# Altium PCB NB3000XN.PcbDoc (part 66 of 71)
Units mil, origin at the board's own origin, x right, y up, seen from the top; angles counter-clockwise.
Board outline 9527.56 x 6929.77 mil, 6 copper layers (Top Layer, GND+SHIELD, MidLayer1, MidLayer2, P2 - 3V3+5V0, Bottom Layer), stack 62.375 mil thick; 832 components, 1027 nets, 4655 pads, 4981 vias.
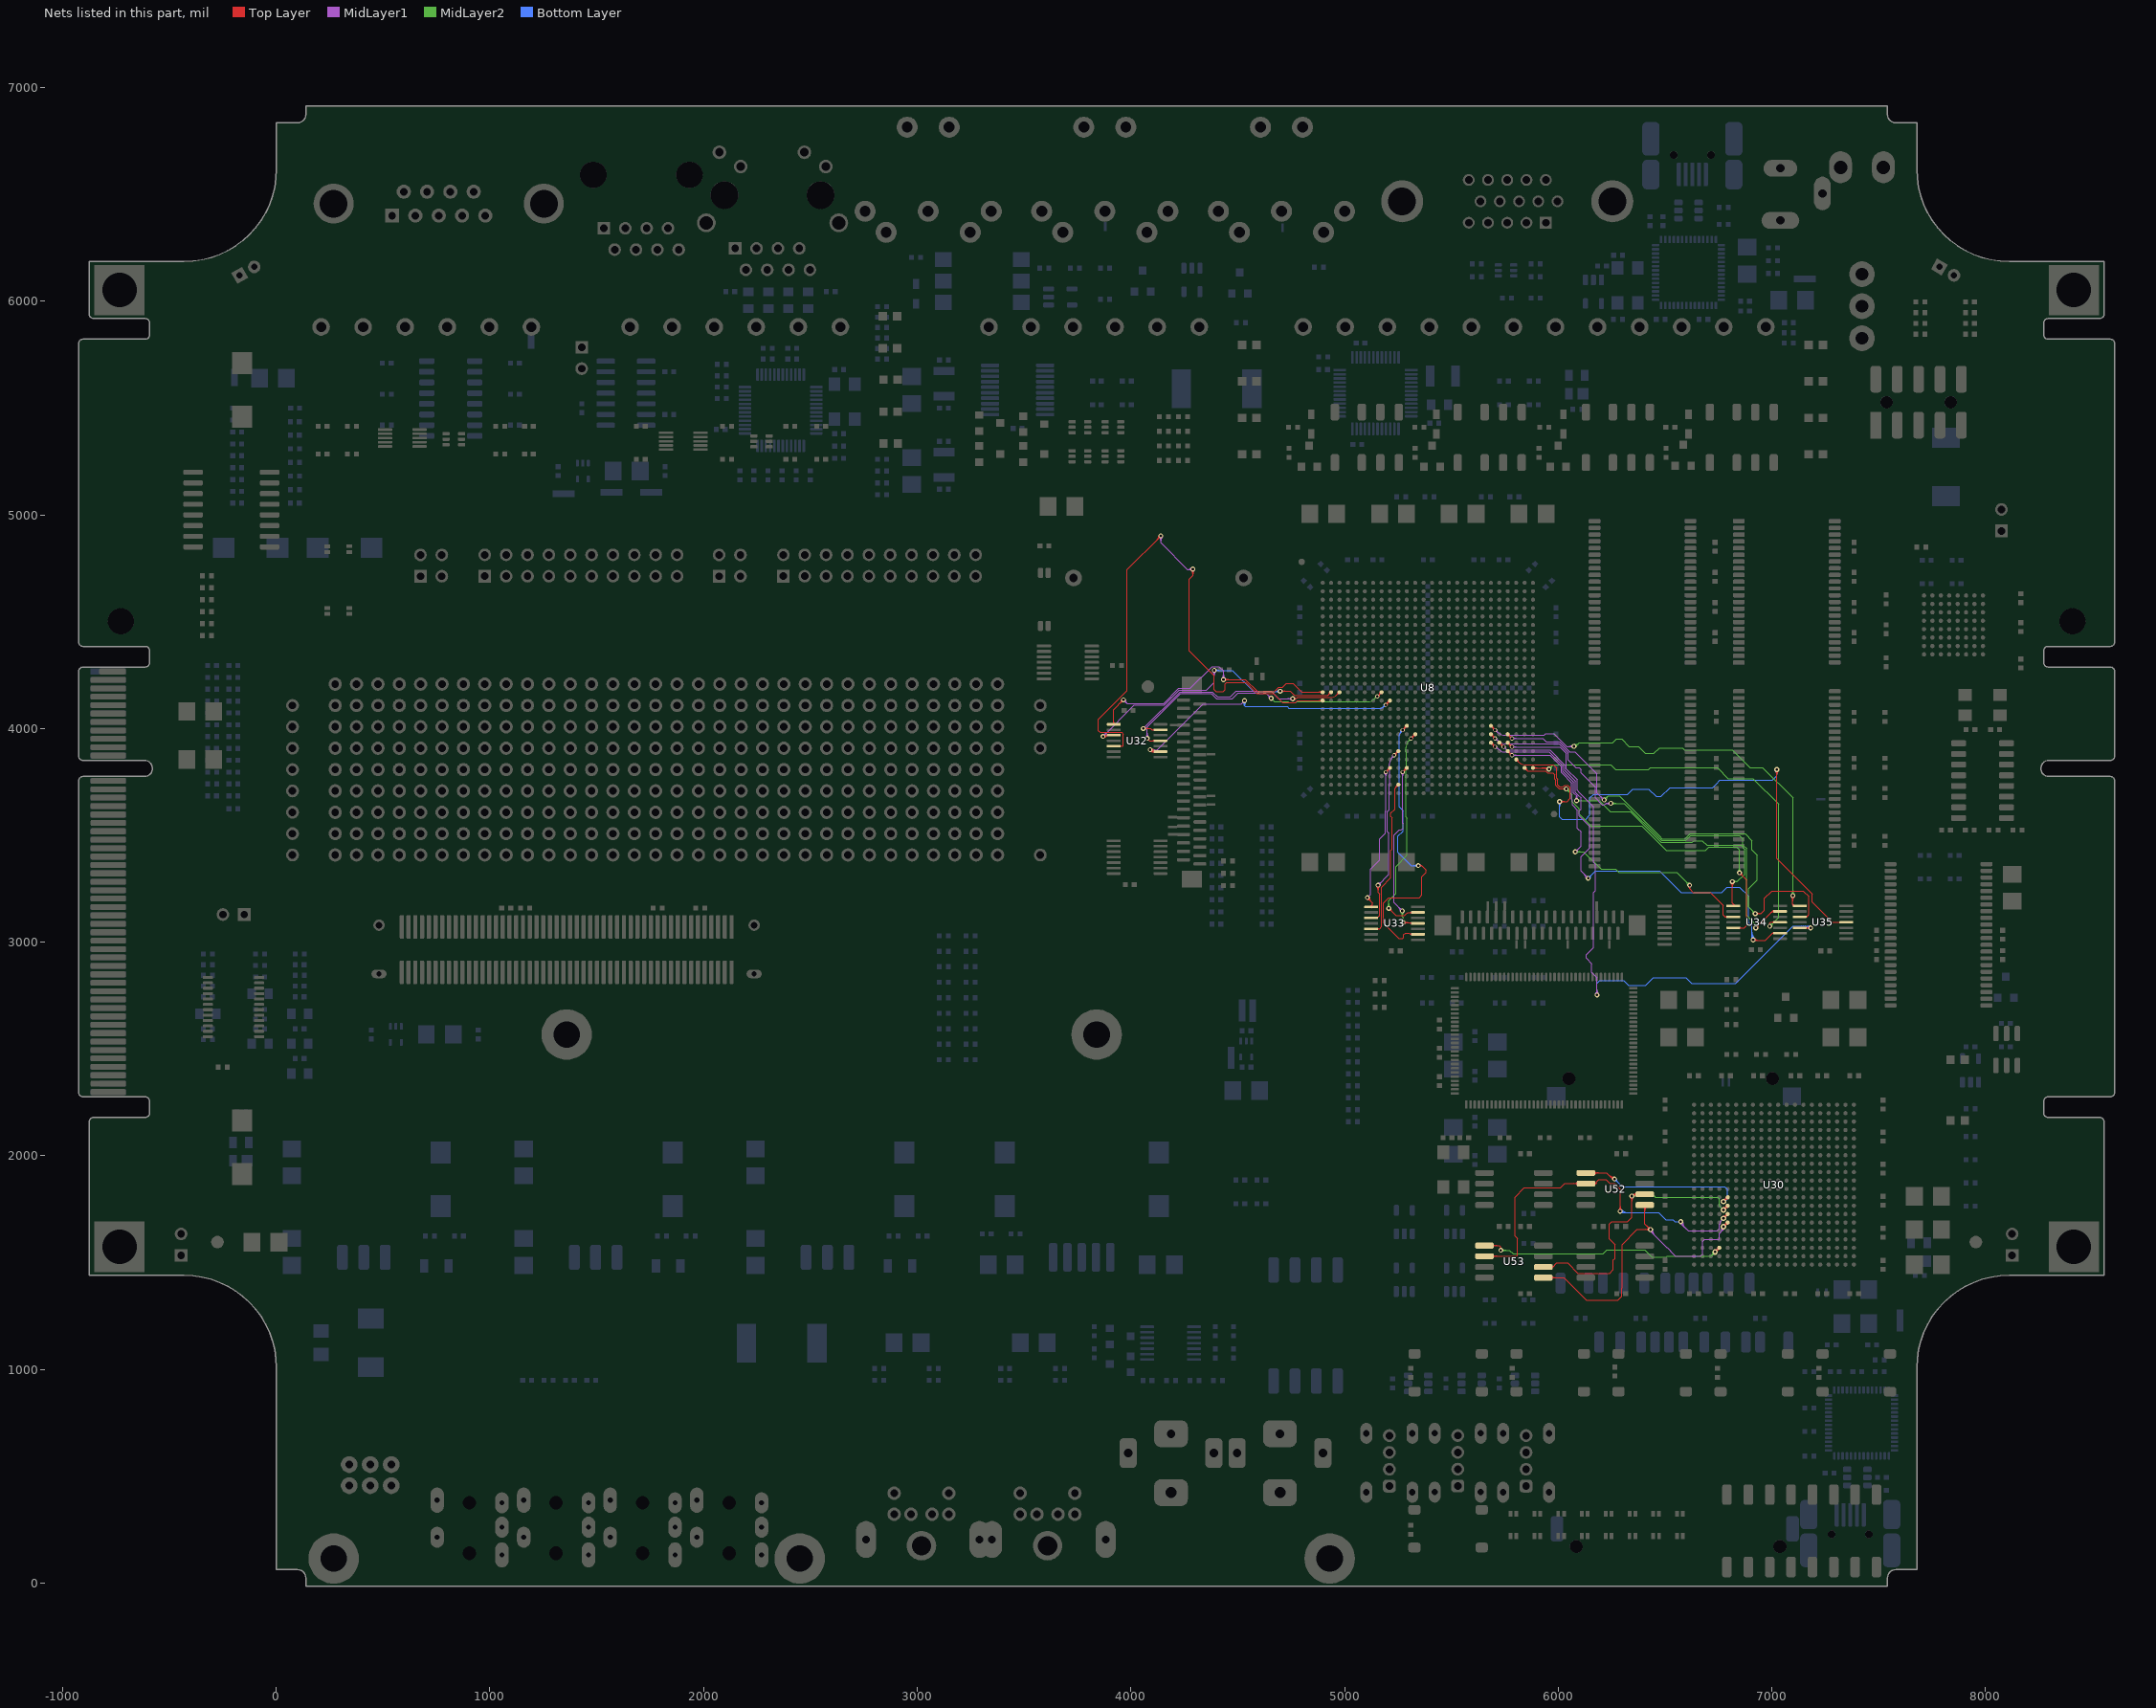
[diagram p70: the nets of this part, all layers, seen from the top]

## Via types
v1: diameter 23, hole 11.81, Top Layer to Bottom Layer, 3672 vias
v2: diameter 26, hole 11.81, Top Layer to Bottom Layer, 461 vias
v3: diameter 19, hole 11.81, Top Layer to Bottom Layer, tented both sides, 396 vias
v4: diameter 23.62, hole 11.81, Top Layer to Bottom Layer, 288 vias
v5: diameter 20, hole 11.81, Top Layer to Bottom Layer, 91 vias
v6: diameter 23, hole 11.81, Top Layer to Bottom Layer, tented both sides, 50 vias
v7: diameter 31, hole 11.81, Top Layer to Bottom Layer, 15 vias
v8: diameter 27.56, hole 11.81, Top Layer to Bottom Layer, tented both sides, 4 vias
v9: diameter 29, hole 11.81, Top Layer to Bottom Layer, 3 vias
v10: diameter 21, hole 11.81, Top Layer to Bottom Layer, 1 vias

## Nets (pads, with @x,y where several pads share a name; then routed paths per layer and width w, separated by ;. In a path a pad name is that pad's centre, name@x,y a point inside that pad or via, vN(x,y) a via of type N, cw(c..) or ccw(c..) an arc to the next point about the centre after c; other vN are vias at no path point) (continued)
USER_FLASH.DIN: U30.T15 U52.5 U53.5 | length 1959.8
  Top Layer w4: U53.5@5930.59,1430 6026.9,1430 6131.86,1325.04 6280.52,1325.04 6297.19,1341.71 6297.19,1380 6300,1382.81 6300,1585 6370.04,1655.04 v1(6431.86,1655.04) 6405.59,1681.31 U52.5@6405.59,1770 ; U53.5@5965.62,1424.5 cw(c5978.9,1411.22) 5978.9,1430 cw(c5978.9,1448.78) U53.5@5965.62,1435.5 ; U53.5@5968.45,1421.67 cw(c5988.56,1401.56) 5988.56,1430 cw(c5988.56,1458.44) U53.5@5968.45,1438.33 ; U52.5@6397.26,1761.67 cw(c6377.15,1741.56) 6405.59,1741.56 cw(c6434.03,1741.56) U52.5@6413.92,1761.67 ; U52.5@6400.09,1764.5 cw(c6386.81,1751.22) 6405.59,1751.22 cw(c6424.37,1751.22) U52.5@6411.09,1764.5 ; v1@6422.36,1655.04 ccw(c6399.42,1655.04) 6415.64,1671.26 ccw(c6431.86,1687.48) v1@6431.86,1664.54 ; v1@6425.14,1648.32 ccw(c6408.92,1632.11) 6408.92,1655.04 ccw(c6408.92,1677.98) v1@6425.14,1661.76 ; v1@6426.36,1655.04 ccw(c6413.08,1655.04) 6422.47,1664.43 ccw(c6431.86,1673.82) v1@6431.86,1660.54 ; v1@6427.97,1651.15 ccw(c6418.58,1641.76) 6418.58,1655.04 ccw(c6418.58,1668.32) v1@6427.97,1658.93
  Top Layer w8: v2(6773.78,1668.15) U30.T15@6793.46,1687.83 ; v2@6773.78,1677.15 ccw(c6773.78,1698.88) 6789.14,1683.51 ccw(c6804.51,1668.15) v2@6782.78,1668.15 ; U30.T15@6787.62,1687.83 cw(c6773.52,1687.83) 6783.49,1677.86 cw(c6793.46,1667.89) U30.T15@6793.46,1681.99
  MidLayer1 w4: v1(6431.86,1655.04) 6431.86,1646.71 6507.75,1570.81 6510.69,1570.81 6525.81,1555.69 6525.81,1552.75 6548.19,1530.37 6665.19,1530.37 6675.19,1540.37 6675.19,1600.04 6684.19,1609.04 6751.86,1609.04 6754.52,1611.71 6754.52,1636.71 6773.52,1655.71 v2@6773.52,1666.45 ; v1@6433.36,1655.04 ccw(c6457.1,1655.04) 6440.31,1638.25 ; v1@6437.36,1655.04 ccw(c6470.75,1655.04) 6447.14,1631.43 ; v1@6441.36,1655.04 ccw(c6484.41,1655.04) 6453.97,1624.6 ; 6760.62,1642.8 ccw(c6748.1,1655.32) v2@6763.94,1663.23 ; 6764.54,1646.73 ccw(c6753.33,1657.94) v2@6767.52,1665.02 ; 6768.47,1650.65 ccw(c6758.57,1660.55) v2@6771.1,1666.81 ; 6772.4,1654.58 ccw(c6763.81,1663.17) v2@6774.67,1668.6
USER_FLASH.DOUT: U30.T14 U52.2 U53.2 | length 2145.6
  Top Layer w4: U53.2@5655,1530 5805,1530 5810,1535 5810,1613.56 5798.52,1625.04 5798.52,1806.71 5841.86,1850.04 6011.23,1850.04 6031.19,1870 6177.97,1870 ; U53.2@5690.03,1524.5 cw(c5703.31,1511.22) 5703.31,1530 cw(c5703.31,1548.78) U53.2@5690.03,1535.5 ; U53.2@5692.86,1521.67 cw(c5712.97,1501.56) 5712.97,1530 cw(c5712.97,1558.44) U53.2@5692.86,1538.33 ; U52.2@6092.14,1861.67 ccw(c6072.03,1841.56) 6072.03,1870 ccw(c6072.03,1898.44) U52.2@6092.14,1878.33 ; U52.2@6094.97,1864.5 ccw(c6081.69,1851.22) 6081.69,1870 ccw(c6081.69,1888.78) U52.2@6094.97,1875.5 ; U52.2@6170.21,1865.05 cw(c6177.97,1861.45) 6177.97,1870 ; U52.2@6170.21,1874.95 ccw(c6177.97,1878.55) 6177.97,1870 ; v1@6283.47,1747.43 ccw(c6267.26,1763.64) 6290.19,1763.64 ccw(c6313.13,1763.64) v1@6296.91,1747.43 ; v1@6286.3,1744.6 ccw(c6276.91,1753.99) 6290.19,1753.99 ccw(c6303.47,1753.99) v1@6294.08,1744.6 ; v1(6290.19,1740.71) 6290.19,1845.04 6265.19,1870.04 6241.19,1870.04 6223.35,1887.88 6189.97,1887.88 6179.64,1877.55 6179.64,1871.67 6177.97,1870
  Top Layer w8: v2(6773.78,1707.52) U30.T14@6793.46,1727.2 ; v2@6773.78,1716.52 ccw(c6773.78,1738.25) 6789.14,1722.88 ccw(c6804.51,1707.52) v2@6782.78,1707.52 ; U30.T14@6787.62,1727.2 cw(c6773.52,1727.2) 6783.49,1717.23 cw(c6793.46,1707.26) U30.T14@6793.46,1721.36
  MidLayer1 w4: v1(6573.52,1691.71) 6573.52,1683.37 6608.52,1648.37 6744.19,1648.37 6754.19,1658.37 6754.19,1678.15 6758.64,1682.6 6758.64,1692.37 v2(6773.78,1707.52) ; v1@6575.02,1691.71 ccw(c6598.76,1691.71) 6581.98,1674.92 ; v1@6579.02,1691.71 ccw(c6612.42,1691.71) 6588.81,1668.09 ; v1@6583.02,1691.71 ccw(c6626.08,1691.71) 6595.63,1661.26
  Bottom Layer w4: v1@6288.42,1738.94 ccw(c6301.86,1752.38) 6301.86,1733.37 ; v1(6290.19,1740.71) 6297.52,1733.37 6469.86,1733.37 6503.19,1700.04 6537.98,1700.04 6546.31,1691.71 v1(6573.52,1691.71) ; v1@6291.25,1741.77 ccw(c6311.51,1762.03) 6311.51,1733.37 ; v1@6294.08,1744.6 ccw(c6321.17,1771.69) 6321.17,1733.37 ; v1@6296.91,1747.43 ccw(c6330.83,1781.35) 6330.83,1733.37
USER_FLASH.FLASH1_CS_N: U30.U18 U53.1 | length 1417.5
  Top Layer w4: U53.1@5655,1580 5725,1580 5731.86,1573.14 v1(5731.86,1558.37) ; U53.1@5690.03,1574.5 cw(c5703.31,1561.22) 5703.31,1580 cw(c5703.31,1598.78) U53.1@5690.03,1585.5 ; U53.1@5692.86,1571.67 cw(c5712.97,1551.56) 5712.97,1580 cw(c5712.97,1608.44) U53.1@5692.86,1588.33
  Top Layer w8: v2(6734.41,1550.04) U30.U18@6754.09,1569.72 ; v2@6734.41,1559.04 ccw(c6734.41,1580.77) 6749.77,1565.4 ccw(c6765.14,1550.04) v2@6743.41,1550.04 ; U30.U18@6748.25,1569.72 cw(c6734.15,1569.72) 6744.12,1559.75 cw(c6754.09,1549.78) U30.U18@6754.09,1563.88
  MidLayer2 w4: v1(5731.86,1558.37) 5771.67,1558.37 5788.67,1541.37 6210.88,1541.37 6228.54,1559.04 6406.19,1559.04 6434.52,1530.71 6438.04,1527.19 6507.38,1527.19 6510.9,1530.71 6715.08,1530.71 v2(6734.41,1550.04) ; v1@5735.75,1554.49 cw(c5745.14,1545.1) 5745.14,1558.37 cw(c5745.14,1571.65) v1@5735.75,1562.26 ; v1@5738.57,1551.66 cw(c5754.79,1535.44) 5754.79,1558.37 cw(c5754.79,1581.31) v1@5738.57,1565.09 ; v2@6723.41,1550.04 cw(c6696.85,1550.04) 6715.63,1531.26 cw(c6734.41,1512.49) v2@6734.41,1539.04 ; v2@6727.41,1550.04 cw(c6710.51,1550.04) 6722.46,1538.09 cw(c6734.41,1526.14) v2@6734.41,1543.04
USER_FLASH.FLASH2_CS_N: U30.T12 U52.1 | length 1120.8
  Top Layer w4: U52.1@6130,1920 6226.9,1920 6255.19,1891.71 v1(6263.52,1891.71) ; U52.1@6165.03,1914.5 cw(c6178.31,1901.22) 6178.31,1920 cw(c6178.31,1938.78) U52.1@6165.03,1925.5 ; U52.1@6167.86,1911.67 cw(c6187.97,1891.56) 6187.97,1920 cw(c6187.97,1948.44) U52.1@6167.86,1928.33 ; 6233.08,1913.82 ccw(c6263.53,1944.26) v1@6263.52,1901.21 ; 6239.91,1906.99 ccw(c6263.52,1930.61) v1@6263.52,1897.21 ; 6246.74,1900.16 ccw(c6263.52,1916.95) v1@6263.52,1893.21
  Top Layer w8: v2(6773.78,1786.26) U30.T12@6793.46,1805.94 ; v2@6773.78,1795.26 ccw(c6773.78,1816.99) 6789.14,1801.62 ccw(c6804.51,1786.26) v2@6782.78,1786.26 ; U30.T12@6787.62,1805.94 cw(c6773.52,1805.94) 6783.49,1795.97 cw(c6793.46,1786) U30.T12@6793.46,1800.1
  Bottom Layer w4: v1@6263.52,1882.21 cw(c6263.52,1859.27) 6279.74,1875.49 cw(c6295.96,1891.71) v1@6273.02,1891.71 ; v1@6263.52,1886.21 cw(c6263.52,1872.93) 6272.91,1882.32 cw(c6282.3,1891.71) v1@6269.02,1891.71 ; v1(6263.52,1891.71) 6299.86,1855.37 6779.19,1855.37 6792.86,1841.71 6792.86,1805.34 v2(6773.78,1786.26) ; v2@6773.78,1793.26 ccw(c6773.78,1810.16) 6785.73,1798.21 ccw(c6797.68,1786.26) v2@6780.78,1786.26 ; v2@6773.78,1797.26 ccw(c6773.78,1823.82) 6792.56,1805.04 ccw(c6811.33,1786.26) v2@6784.78,1786.26
USER_FLASH.SCLK: U30.T13 U52.6 U53.6 | length 1722.7
  Top Layer w4: U53.6@5930.59,1480 5975.9,1480 ; U53.6@5971.41,1476.65 cw(c5975.9,1475.32) 5975.9,1480 ; U53.6@5971.41,1483.35 ccw(c5975.9,1484.68) 5975.9,1480 ; v1@6338.14,1805.32 cw(c6321.92,1789.11) 6344.86,1789.11 cw(c6367.79,1789.11) 6351.57,1805.32 cw(c6387.01,1769.89) U52.6@6387.01,1820 ; v1@6340.97,1808.15 cw(c6331.58,1798.76) 6344.86,1798.76 cw(c6358.14,1798.76) 6348.75,1808.15 cw(c6377.35,1779.55) U52.6@6377.35,1820 ; v1@6343.09,1813.81 cw(c6358.04,1798.86) 6358.04,1820 ; v1@6345.92,1810.98 cw(c6367.69,1789.2) U52.6@6367.69,1820 ; U52.6@6366.56,1813.03 ccw(c6352.82,1802.95) v1@6352.82,1820 ; U52.6@6366.56,1826.97 cw(c6352.82,1837.05) v1@6352.82,1820 ; U52.6@6369.79,1815.4 ccw(c6360.71,1808.74) 6360.71,1820 ccw(c6360.71,1831.26) U52.6@6369.79,1824.6 ; U52.6@6405.59,1820 v1@6352.82,1820 ; 5975.9,1480 5994.27,1498.37 6043.86,1498.37 6092.19,1450.04 6241.52,1450.04 6258.48,1467 6258.48,1511.96 6266.52,1520 6266.52,1585.04 6240.19,1611.37 6240.19,1681.37 6250.52,1691.71 6323.52,1691.71 6344.86,1713.04 v1(6344.86,1812.04) v1@6352.82,1820
  Top Layer w8: v2(6773.78,1746.89) U30.T13@6793.46,1766.57 ; v2@6773.78,1755.89 ccw(c6773.78,1777.62) 6789.14,1762.25 ccw(c6804.51,1746.89) v2@6782.78,1746.89 ; U30.T13@6787.62,1766.57 cw(c6773.52,1766.57) 6783.49,1756.6 cw(c6793.46,1746.63) U30.T13@6793.46,1760.73
  MidLayer2 w4: v1(6344.86,1812.04) 6449,1812.04 6455,1806.04 6748.52,1806.04 6754.52,1800.04 6754.52,1766.37 6773.78,1747.12 v2(6773.78,1746.89) ; v1@6348.75,1808.15 cw(c6358.14,1798.76) 6358.14,1812.04 cw(c6358.14,1825.32) v1@6348.75,1815.93 ; v1@6351.57,1805.32 cw(c6367.79,1789.11) 6367.79,1812.04 cw(c6367.79,1834.98) v1@6351.57,1818.76
USER_LEDS.LED0.BLUE: U8.P2 U32.3 | length 1840.9
  Top Layer w4: v1(3869.52,3963.37) 3874.97,3968.82 U32.3@3920,3968.82 ; v1@3870.58,3962.31 cw(c3886.29,3946.61) 3886.29,3968.82 ; v1@3873.41,3959.49 cw(c3895.95,3936.95) U32.3@3895.95,3968.82 ; v1@3876.24,3956.66 cw(c3905.6,3927.29) U32.3@3905.6,3968.82 ; U32.3@3890.69,3965.99 ccw(c3883.86,3959.16) 3883.86,3968.82 ccw(c3883.86,3978.48) U32.3@3890.69,3971.65 ; v1(4698.52,4175.04) 4730,4175.04 4736,4175.04 4745.79,4175.04 4754.79,4166.04 4766.33,4154.5 4854.95,4154.5 4855.26,4154.81 4860,4154.81 4870,4154.81 4917.53,4154.81 ccw(c4917.53,4164.96) 4924.71,4157.78 ; v1@4702.41,4171.15 cw(c4711.8,4161.76) 4711.8,4175.04 cw(c4711.8,4188.32) v1@4702.41,4178.93 ; v1@4705.24,4168.32 cw(c4721.46,4152.11) 4721.46,4175.04 cw(c4721.46,4197.98) v1@4705.24,4181.76 ; U8.P2@4929.9,4170.31 cw(c4912.17,4170.31) 4924.71,4157.78 ; U8.P2@4937.24,4162.97 ccw(c4937.24,4145.25) 4924.71,4157.78
  MidLayer1 w4: v1(3869.52,3963.37) 4015.86,4109.71 ; v1@3869.52,3968.87 ccw(c3869.52,3982.15) 3878.91,3972.76 ccw(c3888.3,3963.37) v1@3875.02,3963.37 ; v1@3869.52,3972.87 ccw(c3869.52,3995.81) 3885.74,3979.59 ccw(c3901.96,3963.37) v1@3879.02,3963.37 ; 4136.17,4109.71 4015.86,4109.71 ; v1@4383.47,4265.99 cw(c4367.26,4249.77) 4390.19,4249.77 cw(c4413.13,4249.77) v1@4396.91,4265.99 ; v1@4386.3,4268.82 cw(c4376.91,4259.43) 4390.19,4259.43 cw(c4403.47,4259.43) v1@4394.08,4268.82 ; v1(4390.19,4272.71) 4390.19,4215.19 4355,4180 4227.17,4180 4156.88,4109.71 4015.86,4109.71
  Bottom Layer w4: v1(4390.19,4272.71) 4475.86,4272.71 4576.06,4172.5 4695.98,4172.5 v1(4698.52,4175.04) ; v1@4394.08,4268.82 cw(c4403.47,4259.43) 4403.47,4272.71 cw(c4403.47,4285.99) v1@4394.08,4276.6 ; v1@4396.91,4265.99 cw(c4413.13,4249.77) 4413.13,4272.71 cw(c4413.13,4295.64) v1@4396.91,4279.43 ; 4669.46,4172.5 ccw(c4669.46,4204.11) v1@4691.81,4181.76 ; 4679.11,4172.5 ccw(c4679.11,4194.45) v1@4694.64,4178.93 ; 4681.72,4172.5 cw(c4681.72,4158.24) v1@4691.81,4168.32
USER_LEDS.LED0.GREEN: U8.R1 U32.5 | length 2987.1
  Top Layer w4: U32.5@3920,3917.64 3962.64,3917.64 3965.19,3920.19 3965.19,3973.71 3956.86,3982.04 3856.86,3982.04 3848.52,3990.37 3848.52,4043.71 3981.86,4177.04 3981.86,4743.71 v1(4140.19,4902.04) ; U32.5@3949.31,3914.81 cw(c3956.14,3907.98) 3956.14,3917.64 cw(c3956.14,3927.3) U32.5@3949.31,3920.47 ; v1@4130.69,4902.04 cw(c4107.76,4902.04) 4123.97,4885.82 cw(c4140.19,4869.61) v1@4140.19,4892.54 ; v1@4134.69,4902.04 cw(c4121.41,4902.04) 4130.8,4892.65 cw(c4140.19,4883.26) v1@4140.19,4896.54 ; v1@4283.47,4739.99 cw(c4267.26,4723.77) 4290.19,4723.77 cw(c4313.13,4723.77) v1@4296.91,4739.99 ; v1@4286.3,4742.82 cw(c4276.91,4733.43) 4290.19,4733.43 cw(c4303.47,4733.43) v1@4294.08,4742.82 ; v1(4290.19,4746.71) 4290.19,4716.71 4273.19,4699.71 4273.19,4363.71 4291.13,4345.77 4390.19,4246.71 4390.19,4182.37 4398.52,4174.04 4431.86,4174.04 4440.19,4182.37 4440.19,4208.37 4448.52,4216.71 4537.21,4216.71 4589.42,4164.5 4667.4,4164.5 4682.44,4149.46 4710.86,4121.04 4769.52,4121.04 4779.43,4130.94 4860,4130.94 4870,4130.94 U8.R1@4897.87,4130.94 ; U8.R1@4892.57,4125.64 ccw(c4879.77,4112.84) 4879.77,4130.94 ccw(c4879.77,4149.05) U8.R1@4892.57,4136.25 ; U8.R1@4892.68,4125.75 ccw(c4880.15,4113.22) 4880.15,4130.94 ccw(c4880.15,4148.67) U8.R1@4892.68,4136.14
  MidLayer1 w4: v1@4133.47,4895.32 cw(c4117.26,4879.11) 4140.19,4879.11 cw(c4163.13,4879.11) v1@4146.91,4895.32 ; v1@4136.3,4898.15 cw(c4126.91,4888.76) 4140.19,4888.76 cw(c4153.47,4888.76) v1@4144.08,4898.15 ; v1(4140.19,4902.04) 4140.19,4869.69 4264.88,4745 ; 4271.38,4745 cw(c4271.38,4727.9) v1@4283.47,4739.99 ; 4273.91,4745 ccw(c4273.91,4761.48) v1@4286.12,4750.4 ; v1@4283.16,4753.09 cw(c4264.88,4769.68) 4264.88,4745 ; v1@4290,4745 4264.88,4745
USER_LEDS.LED0.RED: U8.P1 U32.1 | length 1547.5
  Top Layer w4: U32.1@3917.17,4022.83 ccw(c3910.34,4029.66) 3920,4029.66 ccw(c3929.66,4029.66) U32.1@3922.83,4022.83 ; U32.1@3920,4020 3920,4089.18 v1(3965.19,4134.37) ; v1@3955.69,4134.37 cw(c3932.76,4134.37) 3948.97,4118.16 cw(c3965.19,4101.94) v1@3965.19,4124.87 ; v1@3959.69,4134.37 cw(c3946.41,4134.37) 3955.8,4124.99 cw(c3965.19,4115.6) v1@3965.19,4128.87 ; v1(4433.52,4229.37) 4535.86,4229.37 4590.19,4175.04 4592.73,4172.5 4670.98,4172.5 4683.33,4184.84 4691.19,4192.71 4710.84,4192.71 4728.84,4210.71 4758.29,4210.71 4798.69,4170.31 4807.92,4170.31 4855.26,4170.31 4860,4170.31 4870,4170.31 U8.P1@4897.87,4170.31 ; v1@4437.41,4225.49 cw(c4446.8,4216.1) 4446.8,4229.37 cw(c4446.8,4242.65) v1@4437.41,4233.26 ; v1@4440.24,4222.66 cw(c4456.46,4206.44) 4456.46,4229.37 cw(c4456.46,4252.31) v1@4440.24,4236.09 ; U8.P1@4892.57,4165.01 ccw(c4879.77,4152.21) 4879.77,4170.31 ccw(c4879.77,4188.42) U8.P1@4892.57,4175.62 ; U8.P1@4892.68,4165.12 ccw(c4880.15,4152.59) 4880.15,4170.31 ccw(c4880.15,4188.04) U8.P1@4892.68,4175.51
  MidLayer1 w4: v1@3965.19,4124.87 cw(c3965.19,4101.94) 3981.41,4118.16 cw(c3997.63,4134.37) v1@3974.69,4134.37 ; v1@3965.19,4128.87 cw(c3965.19,4115.6) 3974.58,4124.99 cw(c3983.97,4134.37) v1@3970.69,4134.37 ; v1(3965.19,4134.37) 3981.86,4117.71 4153.56,4117.71 4223.86,4188 4278,4188 4380.21,4290.21 4412.05,4290.21 4433.52,4268.74 v1(4433.52,4229.37) ; v1@4426.81,4236.09 ccw(c4410.59,4252.31) 4433.52,4252.31 ccw(c4456.46,4252.31) v1@4440.24,4236.09 ; v1@4429.64,4233.26 ccw(c4420.25,4242.65) 4433.52,4242.65 ccw(c4446.8,4242.65) v1@4437.41,4233.26
USER_LEDS.LED1.BLUE: U8.P8 U32.11 | length 1593.3
  Top Layer w4: v1(4076.86,3954.37) 4088,3943.23 U32.11@4138.5,3943.23 ; U32.11@4109.2,3940.4 ccw(c4102.37,3933.57) 4102.37,3943.23 ccw(c4102.37,3952.89) U32.11@4109.2,3946.06 ; v3(5153.78,4150.63) U8.P8@5173.46,4170.31 ; U8.P8@5165.96,4170.31 cw(c5147.86,4170.31) 5160.66,4157.51 cw(c5173.46,4144.71) U8.P8@5173.46,4162.81 ; U8.P8@5166.12,4170.31 cw(c5148.4,4170.31) 5160.93,4157.78 cw(c5173.46,4145.25) U8.P8@5173.46,4162.97 ; 5166.58,4163.43 cw(c5153.78,4176.24) 5153.78,4158.13 ccw(c5153.78,4176.24) 5166.58,4163.43 ; 5166.58,4163.43 ccw(c5179.39,4150.63) 5161.28,4150.63 cw(c5179.39,4150.63) 5166.58,4163.43
  MidLayer1 w4: v1@4070.14,3961.09 ccw(c4053.92,3977.31) 4076.86,3977.31 ccw(c4099.79,3977.31) v1@4083.57,3961.09 ; v1@4072.97,3958.26 ccw(c4063.58,3967.65) 4076.86,3967.65 ccw(c4090.14,3967.65) v1@4080.75,3958.26 ; v1(4076.86,3954.37) 4076.86,4007.06 4233.8,4164 4376.23,4164 4400.52,4139.71 4474.19,4139.71 4501.19,4166.71 4597.23,4166.71 4599.44,4164.5 4620.56,4164.5 4622.77,4166.71 4631.86,4166.71 v1(4656.86,4141.71) ; v1@4647.36,4141.71 ccw(c4624.42,4141.71) 4640.64,4157.93 ccw(c4656.86,4174.14) v1@4656.86,4151.21 ; v1@4651.36,4141.71 ccw(c4638.08,4141.71) 4647.47,4151.1 ccw(c4656.86,4160.49) v1@4656.86,4147.21
  MidLayer2 w4: v1(4656.86,4141.71) 4671.8,4126.77 4735.52,4126.77 4741.52,4120.77 4771.52,4120.77 4777.52,4126.77 4855.26,4126.77 4860,4126.77 4870,4126.77 4997.36,4126.77 5016.78,4126.77 5090.9,4126.77 5110.4,4126.77 ccw(c5110.4,4168.5) 5139.91,4138.99 ; v3@5146.31,4151.28 cw(c5128.27,4152.86) 5139.91,4138.99 ; v3@5153.13,4143.16 ccw(c5151.55,4125.12) 5139.91,4138.99
USER_LEDS.LED1.GREEN: U8.P3 U32.13 | length 1313.1
  Top Layer w4: v1(4058.52,4000.04) 4092.89,4000.04 4098.52,3994.41 U32.13@4138.5,3994.41 ; v1@4062.41,3996.15 cw(c4071.8,3986.76) 4071.8,4000.04 cw(c4071.8,4013.32) v1@4062.41,4003.93 ; v1@4065.24,3993.32 cw(c4081.46,3977.11) 4081.46,4000.04 cw(c4081.46,4022.98) v1@4065.24,4006.76 ; U32.13@4109.2,3991.58 ccw(c4102.37,3984.75) 4102.37,3994.41 ccw(c4102.37,4004.07) U32.13@4109.2,3997.24 ; v1(4757.52,4139.37) 4773.52,4139.37 ; v1@4765.87,4134.83 cw(c4773.52,4130.65) 4773.52,4139.37 ; v1@4765.87,4143.92 ccw(c4773.52,4148.1) 4773.52,4139.37 ; U8.P3@4969.27,4170.31 cw(c4951.55,4170.31) 4964.08,4157.78 ; U8.P3@4976.61,4162.97 ccw(c4976.61,4145.25) 4964.08,4157.78 ; 4773.52,4139.37 4780.6,4146.45 4855.26,4146.45 4860,4146.45 4870,4146.45 4936.73,4146.45 ccw(c4936.73,4185.13) 4964.08,4157.78
  MidLayer1 w4: v1(4058.52,4000.04) 4230.48,4172 4381.23,4172 ; v1@4750.81,4132.66 ccw(c4734.59,4116.44) 4734.59,4139.37 ccw(c4734.59,4162.31) v1@4750.81,4146.09 ; v1@4753.64,4135.49 ccw(c4744.25,4126.1) 4744.25,4139.37 ccw(c4744.25,4152.65) v1@4753.64,4143.26 ; v1(4757.52,4139.37) 4692.86,4139.37 4657.19,4175.04 4619.79,4175.04 4617.25,4172.5 4602.75,4172.5 4600.21,4175.04 4493.19,4175.04 4465.86,4147.71 4405.52,4147.71 ; 4381.23,4172 4405.52,4147.71 ; 4381.23,4172 4405.52,4147.71
USER_LEDS.LED1.RED: U8.R9 U32.9 | length 1687.8
  Top Layer w4: v1@4088.42,3899.27 ccw(c4105.87,3916.72) 4105.87,3892.05 ; v1(4090.19,3901.04) 4090.19,3900.04 4098.18,3892.05 U32.9@4138.5,3892.05 ; v1@4091.25,3902.1 ccw(c4115.52,3926.37) U32.9@4115.52,3892.05 ; v1@4094.08,3904.93 ccw(c4125.18,3936.03) U32.9@4125.18,3892.05 ; v1@4096.91,3907.76 ccw(c4134.84,3945.69) U32.9@4134.84,3892.05 ; U32.9@4109.2,3889.22 ccw(c4102.37,3882.39) 4102.37,3892.05 ccw(c4102.37,3901.71) U32.9@4109.2,3894.88 ; v3(5193.15,4111.26) U8.R9@5212.83,4130.94 ; U8.R9@5205.33,4130.94 cw(c5187.23,4130.94) 5200.03,4118.14 cw(c5212.83,4105.34) U8.R9@5212.83,4123.44 ; U8.R9@5205.49,4130.94 cw(c5187.77,4130.94) 5200.3,4118.41 cw(c5212.83,4105.88) U8.R9@5212.83,4123.6 ; 5205.95,4124.06 cw(c5193.15,4136.87) 5193.15,4118.76 ccw(c5193.15,4136.87) 5205.95,4124.06 ; 5205.95,4124.06 ccw(c5218.76,4111.26) 5200.65,4111.26 cw(c5218.76,4111.26) 5205.95,4124.06
  MidLayer1 w4: v1(4090.19,3901.04) 4122.48,3901.04 4337.15,4115.71 4516.86,4115.71 v1(4531.86,4130.71) ; v1@4094.08,3897.15 cw(c4103.47,3887.76) 4103.47,3901.04 cw(c4103.47,3914.32) v1@4094.08,3904.93 ; v1@4096.91,3894.32 cw(c4113.13,3878.11) 4113.13,3901.04 cw(c4113.13,3923.98) v1@4096.91,3907.76
  Bottom Layer w4: v1@4525.14,4123.99 cw(c4508.92,4107.77) 4531.86,4107.77 cw(c4554.79,4107.77) v1@4538.57,4123.99 ; v1@4527.97,4126.82 cw(c4518.58,4117.43) 4531.86,4117.43 cw(c4545.14,4117.43) v1@4535.75,4126.82 ; v1(4531.86,4130.71) 4531.86,4107.37 4535.32,4103.92 4731.99,4103.92 4740.15,4095.75 4855.26,4095.75 4860,4095.75 4870,4095.75 5076.1,4095.75 5169.64,4095.75 ccw(c5169.64,4109.8) 5179.57,4099.87 ; v3@5185.68,4111.91 cw(c5167.64,4113.49) 5179.28,4099.62 cw(c5190.92,4085.75) v3@5192.5,4103.79
USER_LEDS.LED2.BLUE: U8.AA10 U33.3 | length 1124
  Top Layer w4: U33.3@5125,3113.82 5153.82,3113.82 5165.19,3125.19 5165.19,3225 5156.86,3233.33 v1(5156.86,3266.71) ; v1@5150.14,3259.99 cw(c5133.92,3243.77) 5156.86,3243.77 cw(c5179.79,3243.77) v1@5163.57,3259.99 ; U33.3@5151.48,3117.82 ccw(c5151.48,3133.12) 5162.3,3122.3 ; v1@5152.97,3262.82 cw(c5143.58,3253.43) 5156.86,3253.43 cw(c5170.14,3253.43) v1@5160.75,3262.82 ; v3(5232.52,3875.04) U8.AA10@5252.2,3894.72 ; U8.AA10@5244.7,3894.72 cw(c5226.6,3894.72) 5239.4,3881.92 cw(c5252.2,3869.12) U8.AA10@5252.2,3887.22 ; U8.AA10@5244.86,3894.72 cw(c5227.14,3894.72) 5239.67,3882.19 cw(c5252.2,3869.66) U8.AA10@5252.2,3887.38 ; 5245.32,3887.84 ccw(c5258.13,3875.04) 5240.02,3875.04 cw(c5258.13,3875.04) 5245.32,3887.84 ; 5245.32,3887.84 cw(c5232.52,3900.65) 5232.52,3882.54 ccw(c5232.52,3900.65) 5245.32,3887.84
  MidLayer1 w4: v1(5156.86,3266.71) 5207.86,3317.71 5207.86,3510.73 5200.86,3517.73 5200.86,3611.63 5208.66,3619.43 5208.66,3660 5208.66,3670 5208.66,3718.62 5208.66,3738.04 5208.66,3812.16 ; v1@5156.86,3272.21 ccw(c5156.86,3285.49) 5166.25,3276.1 ccw(c5175.64,3266.71) v1@5162.36,3266.71 ; v1@5156.86,3276.21 ccw(c5156.86,3299.14) 5173.07,3282.93 ccw(c5189.29,3266.71) v1@5166.36,3266.71 ; 5208.66,3798.23 5208.66,3812.16 ; v3@5225.05,3874.39 cw(c5207.01,3872.81) 5220.88,3861.17 ; v3@5233.17,3867.57 ccw(c5234.75,3849.53) 5220.88,3861.17 ; 5208.66,3812.16 5208.66,3831.66 cw(c5250.39,3831.66) 5220.88,3861.17
USER_LEDS.LED2.GREEN: U8.AE10 U33.5 | length 814.7
  Top Layer w4: U33.5@5125,3062.64 5163.52,3062.64 5173.52,3072.64 5173.52,3258.37 5216.19,3301.04 5216.19,3428.82 5222.02,3434.65 5222.02,3495.87 5222.02,3511 5222.02,3583.79 5217.02,3588.79 5217.02,3603.29 5236.7,3622.96 5236.7,3660 5236.7,3670 5236.7,3717.53 ; U33.5@5154.31,3059.81 cw(c5161.14,3052.98) 5161.14,3062.64 cw(c5161.14,3072.3) U33.5@5154.31,3065.47 ; 5236.7,3717.53 cw(c5246.85,3717.53) 5239.67,3724.71 ; 5236.7,3717.53 cw(c5246.85,3717.53) 5239.67,3724.71 ; 5239.67,3724.71 ccw(c5227.14,3737.24) 5244.86,3737.24 cw(c5227.14,3737.24) 5239.67,3724.71 ; 5239.67,3724.71 cw(c5252.2,3712.17) 5252.2,3729.9 ccw(c5252.2,3712.17) 5239.67,3724.71
USER_LEDS.LED2.RED: U8.AC9 U33.1 | length 980.9
  Top Layer w4: v1@5106.86,3198.87 cw(c5106.86,3175.94) 5123.07,3192.16 cw(c5139.29,3208.37) v1@5116.36,3208.37 ; v1@5106.86,3202.87 cw(c5106.86,3189.6) 5116.25,3198.99 cw(c5125.64,3208.37) v1@5112.36,3208.37 ; v1(5106.86,3208.37) 5131.86,3183.37 ; U33.1@5123.07,3168.5 ccw(c5114.88,3183.37) 5131.86,3183.37 ; U33.1@5126.93,3161.5 ccw(c5122.34,3169.84) U33.1@5131.86,3169.84 ; 5131.86,3176.6 cw(c5118.61,3176.6) U33.1@5125,3165 5131.86,3165 5131.86,3183.37 ; v3(5193.15,3796.3) U8.AC9@5212.83,3815.98 ; U8.AC9@5205.33,3815.98 cw(c5187.23,3815.98) 5200.03,3803.18 cw(c5212.83,3790.38) U8.AC9@5212.83,3808.48 ; U8.AC9@5205.49,3815.98 cw(c5187.77,3815.98) 5200.3,3803.45 cw(c5212.83,3790.92) U8.AC9@5212.83,3808.64 ; 5205.95,3809.1 cw(c5193.15,3821.91) 5193.15,3803.8 ccw(c5193.15,3821.91) 5205.95,3809.1 ; 5205.95,3809.1 ccw(c5218.76,3796.3) 5200.65,3796.3 cw(c5218.76,3796.3) 5205.95,3809.1
  MidLayer1 w4: v1(5106.86,3208.37) 5122.5,3224.02 5122.5,3343.06 5165.19,3385.75 5165.19,3483.37 5192.52,3510.71 5192.52,3613.14 5193.15,3613.77 5193.15,3660 5193.15,3670 5193.15,3718.62 v3(5193.15,3796.3) ; v3@5187.85,3791 cw(c5175.04,3778.19) 5193.15,3778.19 cw(c5211.26,3778.19) v3@5198.45,3791 ; v3@5187.96,3791.11 cw(c5175.42,3778.57) 5193.15,3778.57 cw(c5210.88,3778.57) v3@5198.34,3791.11
USER_LEDS.LED3.BLUE: U8.AC11 U33.11 | length 1249.3
  Top Layer w4: v3(5271.89,3796.3) U8.AC11@5291.57,3815.98 ; v1(5273.52,3091.71) 5306.86,3091.71 5310.19,3088.37 5310.19,3088.23 ; v1@5277.41,3087.82 cw(c5286.8,3078.43) 5286.8,3091.71 cw(c5286.8,3104.99) v1@5277.41,3095.6 ; v1@5280.24,3084.99 cw(c5296.46,3068.77) 5296.46,3091.71 cw(c5296.46,3114.64) v1@5280.24,3098.43 ; U8.AC11@5284.07,3815.98 cw(c5265.97,3815.98) 5278.77,3803.18 cw(c5291.57,3790.38) U8.AC11@5291.57,3808.48 ; U8.AC11@5284.23,3815.98 cw(c5266.51,3815.98) 5279.04,3803.45 cw(c5291.57,3790.92) U8.AC11@5291.57,3808.64 ; U33.11@5313.54,3086.27 ccw(c5310.19,3084.39) 5310.19,3088.23 ; U33.11@5313.54,3090.19 cw(c5310.19,3092.06) 5310.19,3088.23 ; U33.11@5343.5,3088.23 5310.19,3088.23 ; 5284.69,3809.1 ccw(c5297.5,3796.3) 5279.39,3796.3 cw(c5297.5,3796.3) 5284.69,3809.1 ; 5284.69,3809.1 cw(c5271.89,3821.91) 5271.89,3803.8 ccw(c5271.89,3821.91) 5284.69,3809.1
  MidLayer1 w4: v1@5260.69,3146.37 ccw(c5237.76,3146.37) 5253.97,3162.59 ccw(c5270.19,3178.81) v1@5270.19,3155.87 ; v1@5264.69,3146.37 ccw(c5251.41,3146.37) 5260.8,3155.76 ccw(c5270.19,3165.15) v1@5270.19,3151.87 ; v3@5266.59,3791 cw(c5253.78,3778.19) 5271.89,3778.19 cw(c5290,3778.19) v3@5277.19,3791 ; v3@5266.7,3791.11 cw(c5254.16,3778.57) 5271.89,3778.57 cw(c5289.62,3778.57) v3@5277.08,3791.11 ; v1(5270.19,3146.37) 5231.86,3184.71 5231.86,3500.67 5256.23,3525.04 5264.86,3525.04 5273.52,3533.71 5273.52,3555 5271.89,3556.63 5271.89,3660 5271.89,3670 5271.89,3718.62 v3(5271.89,3796.3)
  MidLayer2 w4: v1@5263.47,3139.66 cw(c5247.26,3123.44) 5270.19,3123.44 cw(c5293.13,3123.44) v1@5276.91,3139.66 ; v1@5266.3,3142.49 cw(c5256.91,3133.1) 5270.19,3133.1 cw(c5283.47,3133.1) v1@5274.08,3142.49 ; v1@5266.81,3098.43 ccw(c5250.59,3114.64) 5273.52,3114.64 ccw(c5296.46,3114.64) v1@5280.24,3098.43 ; v1@5269.64,3095.6 ccw(c5260.25,3104.99) 5273.52,3104.99 ccw(c5286.8,3104.99) v1@5277.41,3095.6 ; v1(5270.19,3146.37) 5270.19,3119.81 5273.52,3116.48 v1(5273.52,3091.71)
USER_LEDS.LED3.GREEN: U8.W12 U33.13 | length 1288.6
  Top Layer w4: v1@5206.86,3148.87 cw(c5206.86,3125.94) 5223.07,3142.16 cw(c5239.29,3158.37) v1@5216.36,3158.37 ; v1@5206.86,3152.87 cw(c5206.86,3139.6) 5216.25,3148.99 cw(c5225.64,3158.37) v1@5212.36,3158.37 ; v1(5206.86,3158.37) 5240.19,3125.04 5281.86,3125.04 5287.81,3130.99 5296.23,3139.41 U33.13@5343.5,3139.41 ; v3(5311.26,3953.78) U8.W12@5330.94,3973.46 ; U33.13@5314.2,3136.58 ccw(c5307.37,3129.75) 5307.37,3139.41 ccw(c5307.37,3149.07) U33.13@5314.2,3142.24 ; U8.W12@5323.44,3973.46 cw(c5305.34,3973.46) 5318.14,3960.66 cw(c5330.94,3947.86) U8.W12@5330.94,3965.96 ; U8.W12@5323.6,3973.46 cw(c5305.88,3973.46) 5318.41,3960.93 cw(c5330.94,3948.4) U8.W12@5330.94,3966.12 ; 5324.06,3966.58 ccw(c5336.87,3953.78) 5318.76,3953.78 cw(c5336.87,3953.78) 5324.06,3966.58 ; 5324.06,3966.58 cw(c5311.26,3979.39) 5311.26,3961.28 ccw(c5311.26,3979.39) 5324.06,3966.58
  MidLayer1 w4: v1@5205.19,3158.37 v1(5206.86,3158.37)
  MidLayer2 w4: v1@5200.14,3165.09 ccw(c5183.92,3181.31) 5206.86,3181.31 ccw(c5229.79,3181.31) v1@5213.57,3165.09 ; v1@5202.97,3162.26 ccw(c5193.58,3171.65) 5206.86,3171.65 ccw(c5220.14,3171.65) v1@5210.75,3162.26 ; v1(5206.86,3158.37) 5206.86,3194.37 5239.86,3227.37 5239.86,3353.34 5293.19,3406.67 5293.19,3580.37 5287.4,3586.17 5287.4,3660 5287.4,3670 5287.4,3690 ; 5287.4,3680.84 5287.4,3690 ; v3@5303.79,3953.13 cw(c5285.75,3951.55) 5299.62,3939.91 ; v3@5311.91,3946.31 ccw(c5313.49,3928.27) 5299.62,3939.91 ; 5287.4,3690 5287.4,3797.36 5287.4,3816.78 5287.4,3890.9 5287.4,3910.4 cw(c5329.13,3910.4) 5299.62,3939.91
USER_LEDS.LED3.RED: U8.V11 U33.9 | length 1630.4
  Top Layer w4: v3(5271.89,3993.15) U8.V11@5291.57,4012.83 ; U8.V11@5284.07,4012.83 cw(c5265.97,4012.83) 5278.77,4000.03 cw(c5291.57,3987.23) U8.V11@5291.57,4005.33 ; U8.V11@5284.23,4012.83 cw(c5266.51,4012.83) 5279.04,4000.3 cw(c5291.57,3987.77) U8.V11@5291.57,4005.49 ; U33.9@5314.07,3034.35 ccw(c5307.95,3028.76) 5307.95,3037.05 ; U33.9@5314.07,3039.75 cw(c5307.95,3045.33) 5307.95,3037.05 ; U33.9@5343.5,3037.05 5307.95,3037.05 ; v1(5345.19,3358.37) 5361.21,3358.37 ; v1@5353.53,3353.82 cw(c5361.21,3349.62) 5361.21,3358.37 ; v1@5353.53,3362.93 ccw(c5361.21,3367.13) 5361.21,3358.37 ; 5284.69,4005.95 cw(c5271.89,4018.76) 5271.89,4000.65 ccw(c5271.89,4018.76) 5284.69,4005.95 ; 5284.69,4005.95 ccw(c5297.5,3993.15) 5279.39,3993.15 cw(c5297.5,3993.15) 5284.69,4005.95 ; 5307.95,3037.05 5301.95,3043.05 5285.2,3043.05 5277.5,3035.35 5277.5,3022.35 5271.86,3016.71 5253.54,3016.71 5181.86,3088.39 5181.86,3183.37 5206.86,3208.37 5349.52,3208.37 5362.5,3221.35 5362.5,3306.68 5364.19,3308.37 5381.86,3326.04 5381.86,3337.73 5361.21,3358.37
  Bottom Layer w4: 5260.5,3979.57 ccw(c5270.43,3969.64) 5256.38,3969.64 5256.38,3876.1 5256.38,3670 5256.38,3660 5256.38,3633.3 5273.52,3616.16 5273.52,3519.37 5250,3495.85 5250,3420 5311.63,3358.37 v1(5345.19,3358.37) ; v3@5264.42,3992.5 cw(c5246.38,3990.92) 5260.25,3979.28 cw(c5274.12,3967.64) v3@5272.54,3985.68 ; v1@5338.47,3351.66 ccw(c5322.26,3335.44) 5322.26,3358.37 ccw(c5322.26,3381.31) v1@5338.47,3365.09 ; v1@5341.3,3354.49 ccw(c5331.91,3345.1) 5331.91,3358.37 ccw(c5331.91,3371.65) v1@5341.3,3362.26
USER_LEDS.LED4.BLUE: U8.AA23 U34.3 | length 2036.1
  Top Layer w4: U8.AA23@5764.02,3887.22 cw(c5764.02,3869.12) 5776.82,3881.92 cw(c5789.62,3894.72) U8.AA23@5771.52,3894.72 ; U8.AA23@5764.02,3887.38 cw(c5764.02,3869.66) 5776.55,3882.19 cw(c5789.08,3894.72) U8.AA23@5771.36,3894.72 ; U8.AA23@5764.02,3894.72 v3(5783.7,3875.04) ; v1@6610.35,3258.53 cw(c6605.32,3250.04) 6615.19,3250.04 ; v1(6615.19,3266.71) 6615.19,3250.04 ; v1@6620.03,3258.53 ccw(c6625.06,3250.04) 6615.19,3250.04 ; U34.3@6790.69,3115.99 ccw(c6783.86,3109.16) 6783.86,3118.82 ccw(c6783.86,3128.48) U34.3@6790.69,3121.65 ; U34.3@6820,3118.82 6781.18,3118.82 6773.52,3126.48 6773.52,3171.71 6711.86,3233.37 6631.86,3233.37 6615.19,3250.04 ; 5770.9,3887.84 cw(c5758.09,3875.04) 5776.2,3875.04 ccw(c5758.09,3875.04) 5770.9,3887.84 ; 5770.9,3887.84 ccw(c5783.7,3900.65) 5783.7,3882.54 cw(c5783.7,3900.65) 5770.9,3887.84
  MidLayer1 w4: v3(5783.7,3875.04) 5861.38,3875.04 5910,3875.04 5920,3875.04 5923.52,3875.04 5962.33,3875.04 6015,3822.37 6015,3794.9 6063.52,3746.37 6063.52,3670.04 6067.19,3666.37 6067.19,3641.71 6090.19,3618.71 6090.19,3533.37 6106.86,3516.71 6106.86,3450.04 v1(6079.86,3423.04) ; v3@5788.89,3869.85 cw(c5801.43,3857.31) 5801.43,3875.04 cw(c5801.43,3892.77) v3@5788.89,3880.23 ; v1@6079.86,3428.54 ccw(c6079.86,3441.82) 6089.25,3432.43 ccw(c6098.64,3423.04) v1@6085.36,3423.04 ; v1@6079.86,3432.54 ccw(c6079.86,3455.48) 6096.07,3439.26 ccw(c6112.29,3423.04) v1@6089.36,3423.04 ; 5801.81,3875.04 cw(c5801.81,3893.15) 5789,3880.34 ccw(c5801.81,3893.15) 5801.81,3875.04 ; 5801.81,3875.04 ccw(c5801.81,3856.93) 5789,3869.74 cw(c5801.81,3856.93) 5801.81,3875.04
  MidLayer2 w4: v1(6079.86,3423.04) 6119.56,3423.04 6200.9,3341.71 6267.56,3341.71 6283.23,3326.04 6555.86,3326.04 v1(6615.19,3266.71) ; v1@6083.75,3419.15 cw(c6093.14,3409.76) 6093.14,3423.04 cw(c6093.14,3436.32) v1@6083.75,3426.93 ; v1@6086.57,3416.32 cw(c6102.79,3400.11) 6102.79,3423.04 cw(c6102.79,3445.98) v1@6086.57,3429.76 ; v1@6605.69,3266.71 ccw(c6582.76,3266.71) 6598.97,3282.93 ccw(c6615.19,3299.14) v1@6615.19,3276.21 ; v1@6609.69,3266.71 ccw(c6596.41,3266.71) 6605.8,3276.1 ccw(c6615.19,3285.49) v1@6615.19,3272.21
USER_LEDS.LED4.GREEN: U8.AC25 U34.5 | length 1924.8
  Top Layer w4: v1(6037.47,3717.53) 6035.81,3719.19 6004.31,3719.19 5989.19,3734.31 5989.19,3759.75 5984.5,3764.44 5984.5,3783.46 5974.75,3793.21 5949.61,3793.21 5942.34,3800.48 5920,3800.48 5910,3800.48 5862.47,3800.48 ; U34.5@6815.19,3067.64 U34.5@6820,3067.64 6871.47,3067.64 6881.86,3078.02 6881.86,3291.71 v1(6848.52,3325.04) ; v1@6848.52,3315.54 cw(c6848.52,3292.61) 6864.74,3308.82 cw(c6880.96,3325.04) v1@6858.02,3325.04 ; v1@6848.52,3319.54 cw(c6848.52,3306.26) 6857.91,3315.65 cw(c6867.3,3325.04) v1@6854.02,3325.04 ; U34.5@6849.31,3064.81 cw(c6856.14,3057.98) 6856.14,3067.64 cw(c6856.14,3077.29) U34.5@6849.31,3070.47 ; 5855.29,3803.45 ccw(c5862.47,3810.63) 5862.47,3800.48 ; 5855.29,3803.45 ccw(c5862.47,3810.63) 5862.47,3800.48 ; 5855.29,3803.45 cw(c5867.83,3815.98) 5850.1,3815.98 ccw(c5867.83,3815.98) 5855.29,3803.45 ; 5855.29,3803.45 ccw(c5842.76,3790.92) 5842.76,3808.64 cw(c5842.76,3790.92) 5855.29,3803.45
  MidLayer2 w4: v1@6037.47,3708.03 cw(c6037.47,3685.1) 6053.69,3701.31 cw(c6069.9,3717.53) v1@6046.97,3717.53 ; v1@6037.47,3712.03 cw(c6037.47,3698.75) 6046.86,3708.14 cw(c6056.25,3717.53) v1@6042.97,3717.53 ; v1@6841.81,3331.76 ccw(c6825.59,3347.98) 6848.52,3347.98 ccw(c6871.46,3347.98) v1@6855.24,3331.76 ; v1@6844.64,3328.93 ccw(c6835.25,3338.32) 6848.52,3338.32 ccw(c6861.8,3338.32) v1@6852.41,3328.93 ; v1@6848.52,3316.71 v1(6848.52,3325.04) 6848.52,3431.48 6834.12,3445.88 6705.88,3445.88 6690,3430 6506.64,3430 6391.64,3545 6153.56,3545 6098.52,3600.04 6098.52,3625.04 6065.19,3658.37 6065.19,3689.81 v1@6039.22,3715.78 ; v1@6039.22,3715.78 6038.95,3715.78 6035,3719.73 6035,3720 v1(6037.47,3717.53) v1@6039.22,3715.78
USER_LEDS.LED4.RED: U8.Y21 U34.1 | length 2151
  Top Layer w4: U8.Y21@5685.28,3926.59 cw(c5685.28,3908.49) 5698.08,3921.29 cw(c5710.88,3934.09) U8.Y21@5692.78,3934.09 ; U8.Y21@5685.28,3926.75 cw(c5685.28,3909.03) 5697.81,3921.56 cw(c5710.34,3934.09) U8.Y21@5692.62,3934.09 ; U8.Y21@5685.28,3934.09 v3(5704.96,3914.41) ; v1@6808.47,3276.66 cw(c6792.26,3260.44) 6815.19,3260.44 cw(c6838.13,3260.44) v1@6821.91,3276.66 ; v1@6811.3,3279.49 cw(c6801.91,3270.1) 6815.19,3270.1 cw(c6828.47,3270.1) v1@6819.08,3279.49 ; v1(6815.19,3283.37) 6815.19,3183.37 6823.52,3175.04 6823.52,3170 U34.1@6820,3170 ccw(c6806.51,3172.62) 6816.23,3182.34 ; 6821.55,3177.02 cw(c6815.42,3170.89) U34.1@6823.93,3169.24 ; 5692.16,3927.21 cw(c5679.35,3914.41) 5697.46,3914.41 ccw(c5679.35,3914.41) 5692.16,3927.21 ; 5692.16,3927.21 ccw(c5704.96,3940.02) 5704.96,3921.91 cw(c5704.96,3940.02) 5692.16,3927.21
  MidLayer1 w4: v3@5706.26,3907.02 cw(c5709.41,3889.19) 5719.79,3904.02 ; v3@5712.35,3915.71 ccw(c5730.18,3918.86) 5719.79,3904.02 ; 5781.77,3890.55 5767.84,3890.55 ; v1@6079.67,3669.29 ccw(c6065.42,3684.39) 6086.19,3684.39 ; v1@6082.42,3666.38 ccw(c6074.17,3675.12) 6086.19,3675.12 ccw(c6098.21,3675.12) v1@6089.96,3666.38 ; v1(6086.19,3662.37) 6086.19,3684.39 ; v1@6092.71,3669.29 cw(c6106.96,3684.39) 6086.19,3684.39 ; 5719.79,3904.02 5728.37,3896.94 ccw(c5744.59,3914.32) 5744.42,3890.55 ; 5744.42,3890.55 ccw(c5744.59,3914.32) 5744.59,3890.55 ; 5744.42,3890.55 5744.59,3890.55 ; 5744.59,3890.55 5767.84,3890.55 ; 5767.84,3890.55 5841.96,3890.55 5861.38,3890.55 5910,3890.55 5920,3890.55 5958.14,3890.55 6023,3825.69 6023,3798.23 6037.59,3783.65 6072.35,3748.88 6072.35,3698.23 6086.19,3684.39
  MidLayer2 w4: v1(6086.19,3662.37) 6192.63,3662.37 6245,3610 6337.96,3610 6480.25,3467.71 6627.71,3467.71 6635,3475 6675,3475 6696.12,3453.88 6855,3453.88 6873.86,3435.02 6873.86,3318.86 6838.37,3283.37 v1(6815.19,3283.37) ; v1@6090.08,3658.49 cw(c6099.47,3649.1) 6099.47,3662.37 cw(c6099.47,3675.65) v1@6090.08,3666.26 ; v1@6092.91,3655.66 cw(c6109.13,3639.44) 6109.13,3662.37 cw(c6109.13,3685.31) v1@6092.91,3669.09 ; v1@6819.08,3279.49 cw(c6828.47,3270.1) 6828.47,3283.37 cw(c6828.47,3296.65) v1@6819.08,3287.26 ; v1@6821.91,3276.66 cw(c6838.13,3260.44) 6838.13,3283.37 cw(c6838.13,3306.31) v1@6821.91,3290.09
USER_LEDS.LED5.BLUE: U8.AC26 U34.11 | length 2147
  Top Layer w4: U8.AC26@5882.13,3815.98 5910,3815.98 5920,3815.98 5924.74,3815.98 ; U8.AC26@5887.32,3810.79 cw(c5899.85,3798.26) 5899.85,3815.98 cw(c5899.85,3833.71) U8.AC26@5887.32,3821.18 ; U8.AC26@5887.43,3810.68 cw(c5900.23,3797.88) 5900.23,3815.98 cw(c5900.23,3834.09) U8.AC26@5887.43,3821.29 ; 5933.44,3815.98 cw(c5933.44,3790.64) v1@5952.68,3807.13 ; 5942.13,3815.98 cw(c5942.13,3798.09) v1@5955.72,3809.73 ; v1@5949.64,3804.53 ccw(c5924.74,3783.2) 5924.74,3815.98 ; v1(5956.86,3810.71) 5951.58,3815.98 5924.74,3815.98 ; v1(6990.19,3075.04) 6990.19,3090.19 6993.23,3093.23 U34.11@7038.5,3093.23 ; U34.11@7009.2,3090.4 ccw(c7002.37,3083.57) 7002.37,3093.23 ccw(c7002.37,3102.89) U34.11@7009.2,3096.06
  MidLayer2 w4: v1(5956.86,3810.71) 5975.7,3829.56 6246.36,3829.56 6267.54,3808.37 6423.52,3808.37 6431.86,3816.71 6745.54,3816.71 6795.54,3766.71 6901.52,3766.71 6912.21,3766.71 7031.86,3647.06 7031.86,3116.71 v1(6990.19,3075.04) ; v1@5956.86,3816.21 ccw(c5956.86,3829.49) 5966.25,3820.1 ccw(c5975.64,3810.71) v1@5962.36,3810.71 ; v1@5956.86,3820.21 ccw(c5956.86,3843.14) 5973.07,3826.93 ccw(c5989.29,3810.71) v1@5966.36,3810.71 ; v1@6990.19,3080.54 ccw(c6990.19,3093.82) 6999.58,3084.43 ccw(c7008.97,3075.04) v1@6995.69,3075.04 ; v1@6990.19,3084.54 ccw(c6990.19,3107.48) 7006.41,3091.26 ccw(c7022.63,3075.04) v1@6999.69,3075.04
USER_LEDS.LED5.GREEN: U8.W21 U34.13 | length 2421.8
  Top Layer w4: U8.W21@5685.28,3965.96 cw(c5685.28,3947.86) 5698.08,3960.66 cw(c5710.88,3973.46) U8.W21@5692.78,3973.46 ; U8.W21@5685.28,3966.12 cw(c5685.28,3948.4) 5697.81,3960.93 cw(c5710.34,3973.46) U8.W21@5692.62,3973.46 ; U8.W21@5685.28,3973.46 v3(5704.96,3953.78) ; v1(6924.52,3066.71) 7005.82,3148 7036.6,3148 7038.5,3146.1 U34.13@7038.5,3144.41 ; v1@6924.52,3072.21 ccw(c6924.52,3085.49) 6933.91,3076.1 ccw(c6943.3,3066.71) v1@6930.02,3066.71 ; v1@6924.52,3076.21 ccw(c6924.52,3099.14) 6940.74,3082.93 ccw(c6956.96,3066.71) v1@6934.02,3066.71 ; 6988.47,3130.65 cw(c7012.02,3107.1) U34.13@7012.02,3140.41 ; 6995.3,3137.48 cw(c7012.02,3120.76) U34.13@7012.02,3144.41 ; 7002.13,3144.31 cw(c7012.02,3134.41) U34.13@7012.02,3148.41 ; 5692.16,3966.58 cw(c5679.35,3953.78) 5697.46,3953.78 ccw(c5679.35,3953.78) 5692.16,3966.58 ; 5692.16,3966.58 ccw(c5704.96,3979.39) 5704.96,3961.28 cw(c5704.96,3979.39) 5692.16,3966.58
  MidLayer1 w4: v3@5705.61,3946.31 cw(c5707.19,3928.27) 5718.83,3942.14 ; v3@5712.43,3954.43 ccw(c5730.47,3956.01) 5718.83,3942.14 ; 5781.77,3929.92 5767.84,3929.92 ; v1@6240.14,3643.32 ccw(c6223.92,3627.11) 6223.92,3650.04 ccw(c6223.92,3672.98) v1@6240.14,3656.76 ; v1@6242.97,3646.15 ccw(c6233.58,3636.76) 6233.58,3650.04 ccw(c6233.58,3663.32) v1@6242.97,3653.93 ; v1(6246.86,3650.04) 6222.99,3650.04 6214.65,3641.71 6206.86,3641.71 6173.52,3675.04 6173.52,3725.37 6106.86,3792.04 6106.86,3808.37 6098.52,3816.71 6083.29,3816.71 6047,3853 6047,3887.12 6004.2,3929.92 5920,3929.92 5910,3929.92 5861.38,3929.92 5841.96,3929.92 5767.84,3929.92 ; 5718.83,3942.14 ccw(c5748.34,3971.65) 5748.34,3929.92 5767.84,3929.92
  MidLayer2 w4: v1(6246.86,3650.04) 6309.23,3650.04 6483.56,3475.71 6596.82,3475.71 6621.15,3500.04 6848.52,3500.04 6865.19,3483.37 6865.19,3455 6881.86,3438.33 6881.86,3125.04 6924.52,3082.37 v1(6924.52,3066.71) ; v1@6250.75,3646.15 cw(c6260.14,3636.76) 6260.14,3650.04 cw(c6260.14,3663.32) v1@6250.75,3653.93 ; v1@6253.57,3643.32 cw(c6269.79,3627.11) 6269.79,3650.04 cw(c6269.79,3672.98) v1@6253.57,3656.76
USER_LEDS.LED5.RED: U8.Y22 U34.9 | length 2534.1
  Top Layer w4: U8.Y22@5724.65,3926.59 cw(c5724.65,3908.49) 5737.45,3921.29 cw(c5750.25,3934.09) U8.Y22@5732.15,3934.09 ; U8.Y22@5724.65,3926.75 cw(c5724.65,3909.03) 5737.18,3921.56 cw(c5749.71,3934.09) U8.Y22@5731.99,3934.09 ; U8.Y22@5724.65,3934.09 v3(5744.33,3914.41) ; v1(6912.52,3011.04) 6915.19,3008.37 6970,3008.37 7003.67,3042.05 ; v1@6916.41,3014.93 ccw(c6932.24,3030.76) 6932.24,3008.37 ; v1@6919.24,3004.32 cw(c6929.02,2994.54) 6929.02,3008.37 ; v1@6919.24,3017.76 ccw(c6941.9,3040.41) 6941.9,3008.37 ; U34.9@7008.91,3039.54 ccw(c7003.67,3035.33) 7003.67,3042.05 ; U34.9@7008.91,3044.55 cw(c7003.67,3048.76) 7003.67,3042.05 ; U34.9@7038.5,3042.05 7003.67,3042.05 ; 5731.53,3927.21 cw(c5718.72,3914.41) 5736.83,3914.41 ccw(c5718.72,3914.41) 5731.53,3927.21 ; 5731.53,3927.21 ccw(c5744.33,3940.02) 5744.33,3921.91 cw(c5744.33,3940.02) 5731.53,3927.21
  MidLayer1 w4: v3@5744.98,3906.94 cw(c5746.56,3888.9) 5758.2,3902.77 cw(c5769.84,3916.64) v3@5751.8,3915.06 ; 5757.91,3903.02 ccw(c5767.84,3912.95) 5767.84,3898.9 5861.38,3898.9 5910,3898.9 5920,3898.9 5961.1,3898.9 6031,3829 6031,3803.56 6080.35,3754.21 6080.35,3701.55 6091.37,3690.53 6106.86,3675.04 6106.86,3623.37 6098.52,3615.04 6098.52,3591.71 6148.52,3541.71 6148.52,3441.71 6106.86,3400.04 6106.86,3332.37 v1(6140.19,3299.04) ; v1@6130.69,3299.04 ccw(c6107.76,3299.04) 6123.97,3315.26 ccw(c6140.19,3331.48) v1@6140.19,3308.54 ; v1@6134.69,3299.04 ccw(c6121.41,3299.04) 6130.8,3308.43 ccw(c6140.19,3317.82) v1@6140.19,3304.54
  Bottom Layer w4: v1(6140.19,3299.04) 6174.52,3333.37 6474.63,3333.37 6574.63,3233.37 6765.19,3233.37 6789.52,3257.71 6849.19,3257.71 6890.19,3216.71 6890.19,3091.71 6906.86,3075.04 6906.86,3016.71 v1(6912.52,3011.04) ; v1@6140.19,3304.54 ccw(c6140.19,3317.82) 6149.58,3308.43 ccw(c6158.97,3299.04) v1@6145.69,3299.04 ; v1@6140.19,3308.54 ccw(c6140.19,3331.48) 6156.41,3315.26 ccw(c6172.63,3299.04) v1@6149.69,3299.04 ; 6906.86,3028.34 ccw(c6929.83,3028.34) v1@6913.58,3012.1 ; 6906.86,3038 ccw(c6939.48,3038) v1@6916.41,3014.93 ; 6906.86,3047.66 ccw(c6949.14,3047.66) v1@6919.24,3017.76
USER_LEDS.LED6.BLUE: U8.W23 U35.3 | length 2729
  Top Layer w4: U8.W23@5764.02,3965.96 cw(c5764.02,3947.86) 5776.82,3960.66 cw(c5789.62,3973.46) U8.W23@5771.52,3973.46 ; U8.W23@5764.02,3966.12 cw(c5764.02,3948.4) 5776.55,3960.93 cw(c5789.08,3973.46) U8.W23@5771.36,3973.46 ; U8.W23@5764.02,3973.46 v3(5783.7,3953.78) ; v1(6922.52,3133.37) 6948.52,3133.37 6965.19,3150.04 6965.19,3205.39 6999.8,3240 7147.25,3240 7173.52,3213.73 7173.52,3128.52 ; v1@6926.41,3129.49 cw(c6935.8,3120.1) 6935.8,3133.37 cw(c6935.8,3146.65) v1@6926.41,3137.26 ; v1@6929.24,3126.66 cw(c6945.46,3110.44) 6945.46,3133.37 cw(c6945.46,3156.31) v1@6929.24,3140.09 ; U35.3@7130,3118.82 7163.82,3118.82 ; U35.3@7156.48,3118.82 ccw(c7158.1,3132.31) 7167.7,3122.7 ; U35.3@7156.96,3122.79 ccw(c7159.34,3142.71) 7173.52,3128.52 ; U35.3@7159.84,3116.65 cw(c7163.82,3114.09) 7163.82,3118.82 ; U35.3@7159.84,3120.99 ccw(c7163.82,3123.55) 7163.82,3118.82 ; 5770.9,3966.58 cw(c5758.09,3953.78) 5776.2,3953.78 ccw(c5758.09,3953.78) 5770.9,3966.58 ; 5770.9,3966.58 ccw(c5783.7,3979.39) 5783.7,3961.28 cw(c5783.7,3979.39) 5770.9,3966.58 ; 7163.82,3118.82 7173.52,3128.52
  MidLayer1 w4: v3(5783.7,3953.78) 5861.38,3953.78 5910,3953.78 5920,3953.78 5928.12,3953.78 5942.9,3939 6006.43,3939 6053.73,3891.71 6077.86,3891.71 6181.86,3787.71 6181.86,3699.04 v1(6215.19,3665.71) ; v3@5788.89,3948.59 cw(c5801.43,3936.05) 5801.43,3953.78 cw(c5801.43,3971.51) v3@5788.89,3958.97 ; v3@5789,3948.48 cw(c5801.81,3935.67) 5801.81,3953.78 cw(c5801.81,3971.89) v3@5789,3959.08 ; v1@6205.69,3665.71 ccw(c6182.76,3665.71) 6198.97,3681.93 ccw(c6215.19,3698.14) v1@6215.19,3675.21 ; v1@6209.69,3665.71 ccw(c6196.41,3665.71) 6205.8,3675.1 ccw(c6215.19,3684.49) v1@6215.19,3671.21
  MidLayer2 w4: v1(6215.19,3665.71) 6234.48,3685 6285.58,3685 6474.77,3495.81 6486.88,3483.71 6593.5,3483.71 6618.17,3508.37 6874.52,3508.37 6907.86,3475.04 6907.86,3432.37 6931.86,3408.37 6931.86,3291.71 6890.19,3250.04 6890.19,3165.71 v1(6922.52,3133.37) ; v1@6215.19,3671.21 ccw(c6215.19,3684.49) 6224.58,3675.1 ccw(c6233.97,3665.71) v1@6220.69,3665.71 ; v1@6215.19,3675.21 ccw(c6215.19,3698.14) 6231.41,3681.93 ccw(c6247.63,3665.71) v1@6224.69,3665.71 ; v1@6913.02,3133.37 ccw(c6890.09,3133.37) 6906.31,3149.59 ccw(c6922.52,3165.81) v1@6922.52,3142.87 ; v1@6917.02,3133.37 ccw(c6903.75,3133.37) 6913.13,3142.76 ccw(c6922.52,3152.15) v1@6922.52,3138.87
USER_LEDS.LED6.GREEN: U8.Y23 U35.5 | length 3272.9
  Top Layer w4: U8.Y23@5764.02,3926.59 cw(c5764.02,3908.49) 5776.82,3921.29 cw(c5789.62,3934.09) U8.Y23@5771.52,3934.09 ; U8.Y23@5764.02,3926.75 cw(c5764.02,3909.03) 5776.55,3921.56 cw(c5789.08,3934.09) U8.Y23@5771.36,3934.09 ; U8.Y23@5764.02,3934.09 v3(5783.7,3914.41) ; U35.5@7130,3067.64 7180.93,3067.64 v1(7181.86,3066.71) ; U35.5@7156.68,3067.64 cw(c7156.68,3041.53) v1@7175.14,3059.99 ; U35.5@7159.31,3064.81 cw(c7166.14,3057.98) 7166.14,3067.64 cw(c7166.14,3077.29) U35.5@7159.31,3070.47 ; U35.5@7161.17,3067.64 ccw(c7161.17,3087.4) v1@7175.14,3073.43 ; 7166.33,3067.64 cw(c7166.33,3051.18) v1@7177.97,3062.82 ; 5770.9,3927.21 cw(c5758.09,3914.41) 5776.2,3914.41 ccw(c5758.09,3914.41) 5770.9,3927.21 ; 5770.9,3927.21 ccw(c5783.7,3940.02) 5783.7,3921.91 cw(c5783.7,3940.02) 5770.9,3927.21
  MidLayer1 w4: v3(5783.7,3914.41) 5861.38,3914.41 5910,3914.41 5920,3914.41 5924.74,3914.41 ; v3@5788.89,3909.22 cw(c5801.43,3896.68) 5801.43,3914.41 cw(c5801.43,3932.14) v3@5788.89,3919.6 ; 5925.07,3914.41 6008.4,3914.41 6039,3883.81 6039,3809.56 6088.35,3760.21 6088.35,3711.21 6095.86,3703.7 6165.19,3634.37 6165.19,3374.43 6174.19,3365.43 6174.19,3241.71 6165.19,3232.71 6165.19,2975.04 6131.86,2941.71 6131.86,2925.04 6156.86,2900.04 6156.86,2858.37 6181.86,2833.37 v1(6181.86,2752.71) ; v1@6175.14,2759.43 ccw(c6158.92,2775.64) 6181.86,2775.64 ccw(c6204.79,2775.64) v1@6188.57,2759.43 ; v1@6177.97,2756.6 ccw(c6168.58,2765.99) 6181.86,2765.99 ccw(c6195.14,2765.99) v1@6185.75,2756.6 ; 5801.81,3914.41 cw(c5801.81,3932.52) 5789,3919.71 ccw(c5801.81,3932.52) 5801.81,3914.41 ; 5801.81,3914.41 ccw(c5801.81,3896.3) 5789,3909.11 cw(c5801.81,3896.3) 5801.81,3914.41
  Bottom Layer w4: v1@6175.14,2759.43 ccw(c6158.92,2775.64) 6181.86,2775.64 ccw(c6204.79,2775.64) v1@6188.57,2759.43 ; v1@6177.97,2756.6 ccw(c6168.58,2765.99) 6181.86,2765.99 ccw(c6195.14,2765.99) v1@6185.75,2756.6 ; v1(6181.86,2752.71) 6181.86,2806.37 6195.52,2820.04 6305.9,2820.04 6328.56,2797.37 6410.17,2797.37 6446.17,2833.37 6598.52,2833.37 6623.86,2808.04 6831.52,2808.04 6840.19,2816.71 7098.52,3075.04 7173.52,3075.04 v1(7181.86,3066.71) ; 7138.8,3075.04 cw(c7138.8,3023.66) v1@7175.14,3059.99 ; 7148.46,3075.04 cw(c7148.46,3033.31) v1@7177.97,3062.82 ; 7158.12,3075.04 cw(c7158.12,3042.97) v1@7180.8,3065.65 ; 7167.78,3075.04 cw(c7167.78,3052.63) v1@7183.62,3068.48
USER_LEDS.LED6.RED: U8.V21 U35.1 | length 2515.8
  Top Layer w4: U8.V21@5685.28,4005.33 cw(c5685.28,3987.23) 5698.08,4000.03 cw(c5710.88,4012.83) U8.V21@5692.78,4012.83 ; U8.V21@5685.28,4005.49 cw(c5685.28,3987.77) 5697.81,4000.3 cw(c5710.34,4012.83) U8.V21@5692.62,4012.83 ; U8.V21@5685.28,4012.83 v3(5704.96,3993.15) ; v1@7091.81,3211.66 cw(c7079.61,3199.46) 7096.86,3199.46 ; 7096.24,3178.51 cw(c7088.31,3170.57) U35.1@7099.52,3170.15 ; 7096.86,3191.42 cw(c7125.48,3191.42) v1@7105.24,3211.66 ; 7096.86,3201.07 cw(c7115.83,3201.07) v1@7102.41,3214.49 ; v1@7096.86,3216.71 7096.86,3177.89 7104.75,3170 U35.1@7130,3170 ; 7098.79,3175.96 ccw(c7103.52,3180.69) U35.1@7103.52,3174 ; 5692.16,4005.95 cw(c5679.35,3993.15) 5697.46,3993.15 ccw(c5679.35,3993.15) 5692.16,4005.95 ; 5692.16,4005.95 ccw(c5704.96,4018.76) 5704.96,4000.65 cw(c5704.96,4018.76) 5692.16,4005.95
  MidLayer1 w4: v3@5705.61,3985.68 cw(c5707.19,3967.64) 5718.83,3981.51 ; v3@5712.43,3993.8 ccw(c5730.47,3995.38) 5718.83,3981.51 ; 5781.77,3969.29 5767.84,3969.29 ; v1@6066.81,3909.99 ccw(c6050.59,3893.77) 6050.59,3916.71 ccw(c6050.59,3939.64) v1@6066.81,3923.43 ; v1@6069.64,3912.82 ccw(c6060.25,3903.43) 6060.25,3916.71 ccw(c6060.25,3929.99) v1@6069.64,3920.6 ; v1(6073.52,3916.71) 6040.04,3916.71 5979.6,3977.15 5942.3,3977.15 5934.79,3969.64 5934.64,3969.64 5934.29,3969.29 5920,3969.29 5910,3969.29 5861.38,3969.29 5841.96,3969.29 5767.84,3969.29 ; 5718.83,3981.51 ccw(c5748.34,4011.02) 5748.34,3969.29 5767.84,3969.29
  MidLayer2 w4: v1(6073.52,3916.71) 6081.86,3916.71 6098.52,3933.37 ; v1@6073.79,3918.18 ccw(c6076.57,3933.67) 6087.7,3922.55 ; v1@6074.5,3922.12 ccw(c6078.21,3942.85) 6093.11,3927.96 ; v1@6075.2,3926.06 ccw(c6079.86,3952.04) 6098.52,3933.37 ; v1@7091.81,3225.09 ccw(c7075.59,3241.31) 7098.52,3241.31 ccw(c7121.46,3241.31) v1@7105.24,3225.09 ; v1@7094.64,3222.26 ccw(c7085.25,3231.65) 7098.52,3231.65 ccw(c7111.8,3231.65) v1@7102.41,3222.26 ; v1(7098.52,3218.37) 7098.52,3675.04 6956.86,3816.71 6897.52,3816.71 6814.19,3900.04 6590.19,3900.04 6581.86,3908.37 6473.52,3908.37 6448.52,3883.37 6408.52,3883.37 6375.19,3916.71 6331.86,3916.71 6297.52,3951.04 6273.19,3951.04 6255.52,3933.37 6123.12,3933.37 6098.52,3933.37
USER_LEDS.LED7.BLUE: U8.AB24 U35.11 | length 3059.9
  Top Layer w4: 5924.74,3831.49 5920,3831.49 ; v1(6006.86,3658.37) 6042.52,3658.37 6056.86,3672.71 6056.86,3722.89 6044.72,3735.03 6030.22,3735.03 6022.38,3727.19 6007.62,3727.19 5997.19,3737.62 5997.19,3763.06 5992.5,3767.75 5992.5,3815.48 5976.48,3831.49 5920,3831.49 ; v1@6010.75,3654.49 cw(c6020.14,3645.1) 6020.14,3658.37 cw(c6020.14,3671.65) v1@6010.75,3662.26 ; v1@6013.57,3651.66 cw(c6029.79,3635.44) 6029.79,3658.37 cw(c6029.79,3681.31) v1@6013.57,3665.09 ; v1@7016.81,3801.66 cw(c7000.59,3785.44) 7023.52,3785.44 cw(c7046.46,3785.44) v1@7030.24,3801.66 ; v1@7019.64,3804.49 cw(c7010.25,3795.1) 7023.52,3795.1 cw(c7036.8,3795.1) v1@7027.41,3804.49 ; v1(7023.52,3808.37) 7023.52,3391.71 7139.99,3275.24 7140.19,3275.04 ; 7315.19,3093.23 7283.32,3093.23 7189.52,3187.02 7189.52,3225.71 ; 5815.92,3842.82 ccw(c5843.27,3870.17) 5843.27,3831.49 ; 5815.92,3842.82 ccw(c5843.27,3870.17) 5843.27,3831.49 ; 5815.92,3842.82 ccw(c5803.39,3830.29) 5803.39,3848.01 cw(c5803.39,3830.29) 5815.92,3842.82 ; 5815.92,3842.82 cw(c5828.45,3855.35) 5810.73,3855.35 ccw(c5828.45,3855.35) 5815.92,3842.82 ; 5843.27,3831.49 5885.56,3831.49 5910,3831.49 5920,3831.49 ; 7140.19,3275.04 7189.52,3225.71 ; 7140.19,3275.04 7189.52,3225.71
  Bottom Layer w4: v1@6000.14,3651.66 cw(c5983.92,3635.44) 6006.86,3635.44 cw(c6029.79,3635.44) v1@6013.57,3651.66 ; v1@6002.97,3654.49 cw(c5993.58,3645.1) 6006.86,3645.1 cw(c6020.14,3645.1) v1@6010.75,3654.49 ; v1(6006.86,3658.37) 6006.86,3585.35 6017.5,3574.71 6123.19,3574.71 ; 6040.19,3575.04 6123.52,3575.04 ; v1@7016.81,3801.66 cw(c7000.59,3785.44) 7023.52,3785.44 cw(c7046.46,3785.44) v1@7030.24,3801.66 ; v1@7019.64,3804.49 cw(c7010.25,3795.1) 7023.52,3795.1 cw(c7036.8,3795.1) v1@7027.41,3804.49 ; v1(7023.52,3808.37) 7023.52,3780 7002.23,3758.71 6757.19,3758.71 6740.19,3741.71 6722.52,3724.04 6524.19,3724.04 6481.86,3681.71 6458.52,3681.71 6423.52,3716.71 6348.52,3716.71 6323.52,3691.71 6165.19,3691.71 6148.52,3675.04 6148.52,3594.69 6128.88,3575.04 ; 6123.19,3574.71 6128.54,3574.71 6128.88,3575.04 ; 6123.19,3574.71 6123.52,3575.04 ; 6123.52,3575.04 6128.88,3575.04